# Altium PCB Vortex_PCB_final.PcbDoc (part 2 of 2)
Units mm, origin at the board's own origin, x right, y up, seen from the top; angles counter-clockwise.
Board outline 125 x 90 mm, 2 copper layers (Top Layer, Bottom Layer); 148 components, 88 nets, 464 pads, 104 vias.
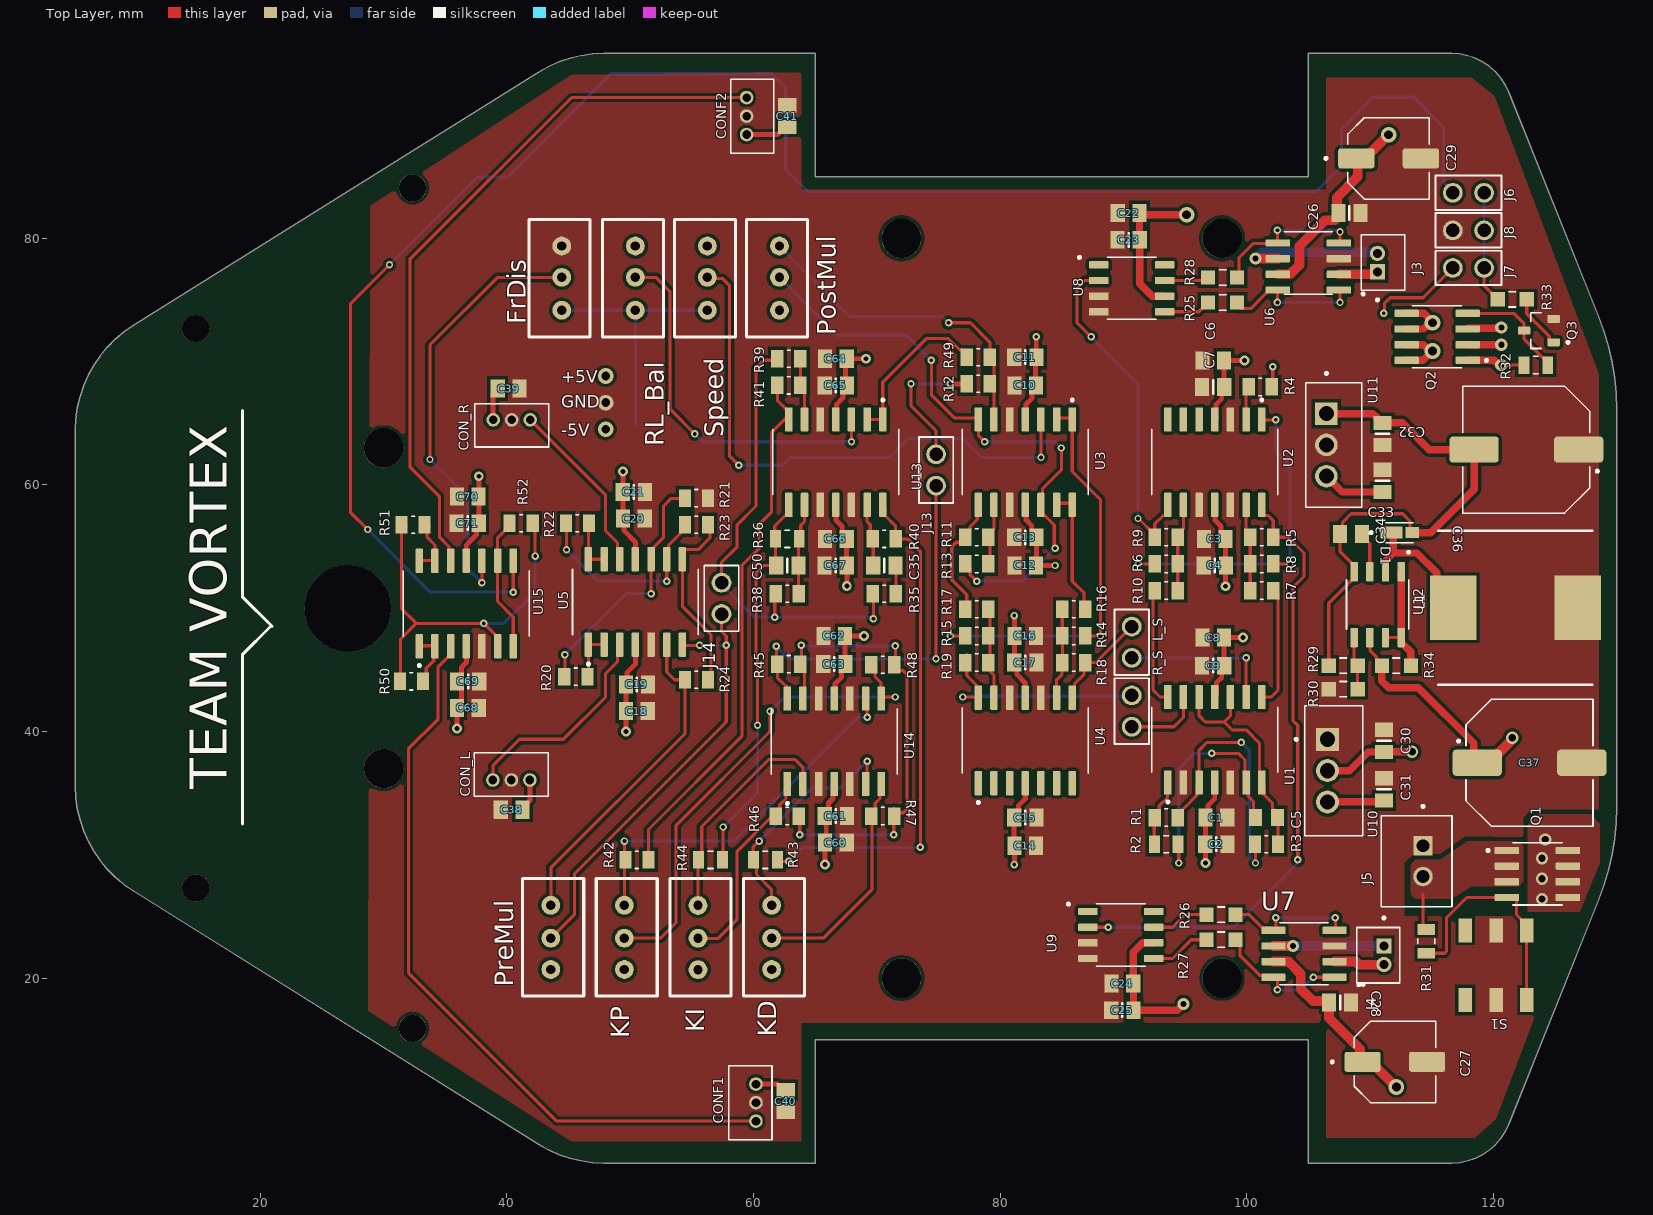
[diagram p0: Top Layer view]

## Polygon pours and split planes (outlines as drawn) (continued)
-5V on Bottom Layer "-5V_L02_P001" (solid, pour order 1): 96.026,68.422 93.726,66.122 93.726,62.572 87.552,57.658 58.801,57.658 50.839,66.288 46.499,66.288 44.704,63.881 40.209,63.881 33.528,57.703 33.528,47.939 38.029,43.688 65.303,43.688 107.823,43.688 115.824,51.308 115.824,61.722 109.029,68.516
VIN_Motor on Bottom Layer "VIN_MOTOR_L02_P006" (solid, pour order 6): 119.574,24.316 119.665,34.767 118.491,35.941 113.567,35.941 111.887,37.338 111.887,39.495 113.159,40.767 118.669,40.767 121.167,42.902 121.289,64.985 118.622,67.652 118.6,80.409 114.808,84.201 114.808,88.646 113.03,90.424 110.744,90.424 108.839,88.519 108.839,85.217 106.68,83.058 93.853,83.058 93.853,80.01 110.363,80.01 112.903,77.47 113.03,65.82 116.615,62.236 116.615,50.881 108.323,42.871 108.181,35.789 114.732,30.357 114.859,22.297 112.203,19.558 93.853,19.558 93.853,16.51 107.823,16.51 109.347,14.986 109.347,9.779 111.252,7.874 114.393,7.874 119.475,12.956
VIN on Bottom Layer "VIN_L02_P005" (solid, pour order 5): 120.179,35.574 119.119,36.449 113.949,36.449 112.658,37.492 112.647,39.151 113.919,40.218 119.138,40.218 121.92,42.71 121.92,65.958 119.507,68.371 119.507,73.406 120.396,74.295 126.485,74.295 127.614,72.404 128.57,69.296 128.57,31.288 126.2,25.273 124.911,24.384 121.92,24.384 120.187,26.117
GND on Top Layer "NONET_L-01_P-001" (solid, remove dead copper, pour order 0): 63.881,93.48 45.263,93.281 28.927,82.642 28.737,17.35 45.229,6.752 63.881,6.752 63.881,16.383 106.431,16.383 106.431,7.066 118.491,7.066 120.179,8.564 126.453,25.019 112.776,25.019 112.776,29.337 113.538,30.099 115.697,30.099 117.729,31.496 122.428,31.424 122.428,33.02 123.08,33.712 128.57,33.712 128.57,68.992 120.067,91.548 118.237,93.006 106.431,93.006 106.431,83.947 63.881,83.947
VIN on Top Layer "VIN_L01_P003" (solid, pour order 3): 122.809,25.4 122.809,32.385 123.698,33.274 127.887,33.274 128.651,32.51 128.651,29.337 127,25.4
VBAT on Top Layer "VBAT_L01_P004" (solid, pour order 4): 117.922,31.102 115.65,29.591 113.665,29.591 113.284,29.21 113.284,26.805 113.665,26.424 116.648,26.424 118.237,27.432 122.047,27.432 122.428,27.813 122.428,30.734 121.927,31.102

## Silkscreen, mask and mechanical layers (free items; w line width, h text height)
Top Overlay:
  circle w0.2: c109.445,19.495 r0.1
  circle w0.2: c109.445,75.495 r0.1
  lines w0.127: 103.05,75.475 106.95,75.475 ; 103.05,80.525 106.95,80.525
  lines w0.254: 18.542,32.512 18.542,46.228 20.828,48.514 ; 18.542,66.04 18.542,50.927 20.955,48.514
  text "+5V" at 44.396,68.272 h1
  text "GND" at 44.396,66.24 h1
  text "-5V" at 44.396,63.954 h1
  text "TEAM VORTEX" at 17.272,35.306 h3 r90
Mechanical 1:
  drawing of 336 lines, arcs and shapes, not listed
Mechanical 13:
  circle w0.2: c109.445,19.495 r0.1
  circle w0.2: c109.445,75.495 r0.1
  lines w0.127: 103.05,75.55 106.95,75.55 106.95,80.45 103.05,80.45 103.05,75.55
Mechanical 15:
  lines w0.05: 101.29,75.25 101.29,80.75 108.71,80.75 108.71,75.25 101.29,75.25